# Altium PCB SPARC_v3.PcbDoc
Units mil, origin at the board's own origin, x right, y up, seen from the top; angles counter-clockwise.
Board outline 6000 x 4000 mil, 2 copper layers (Top Layer, Bottom Layer); 19 components, 16 nets, 91 pads, 0 vias.
Unrouted connection lines stored in the file: 55.
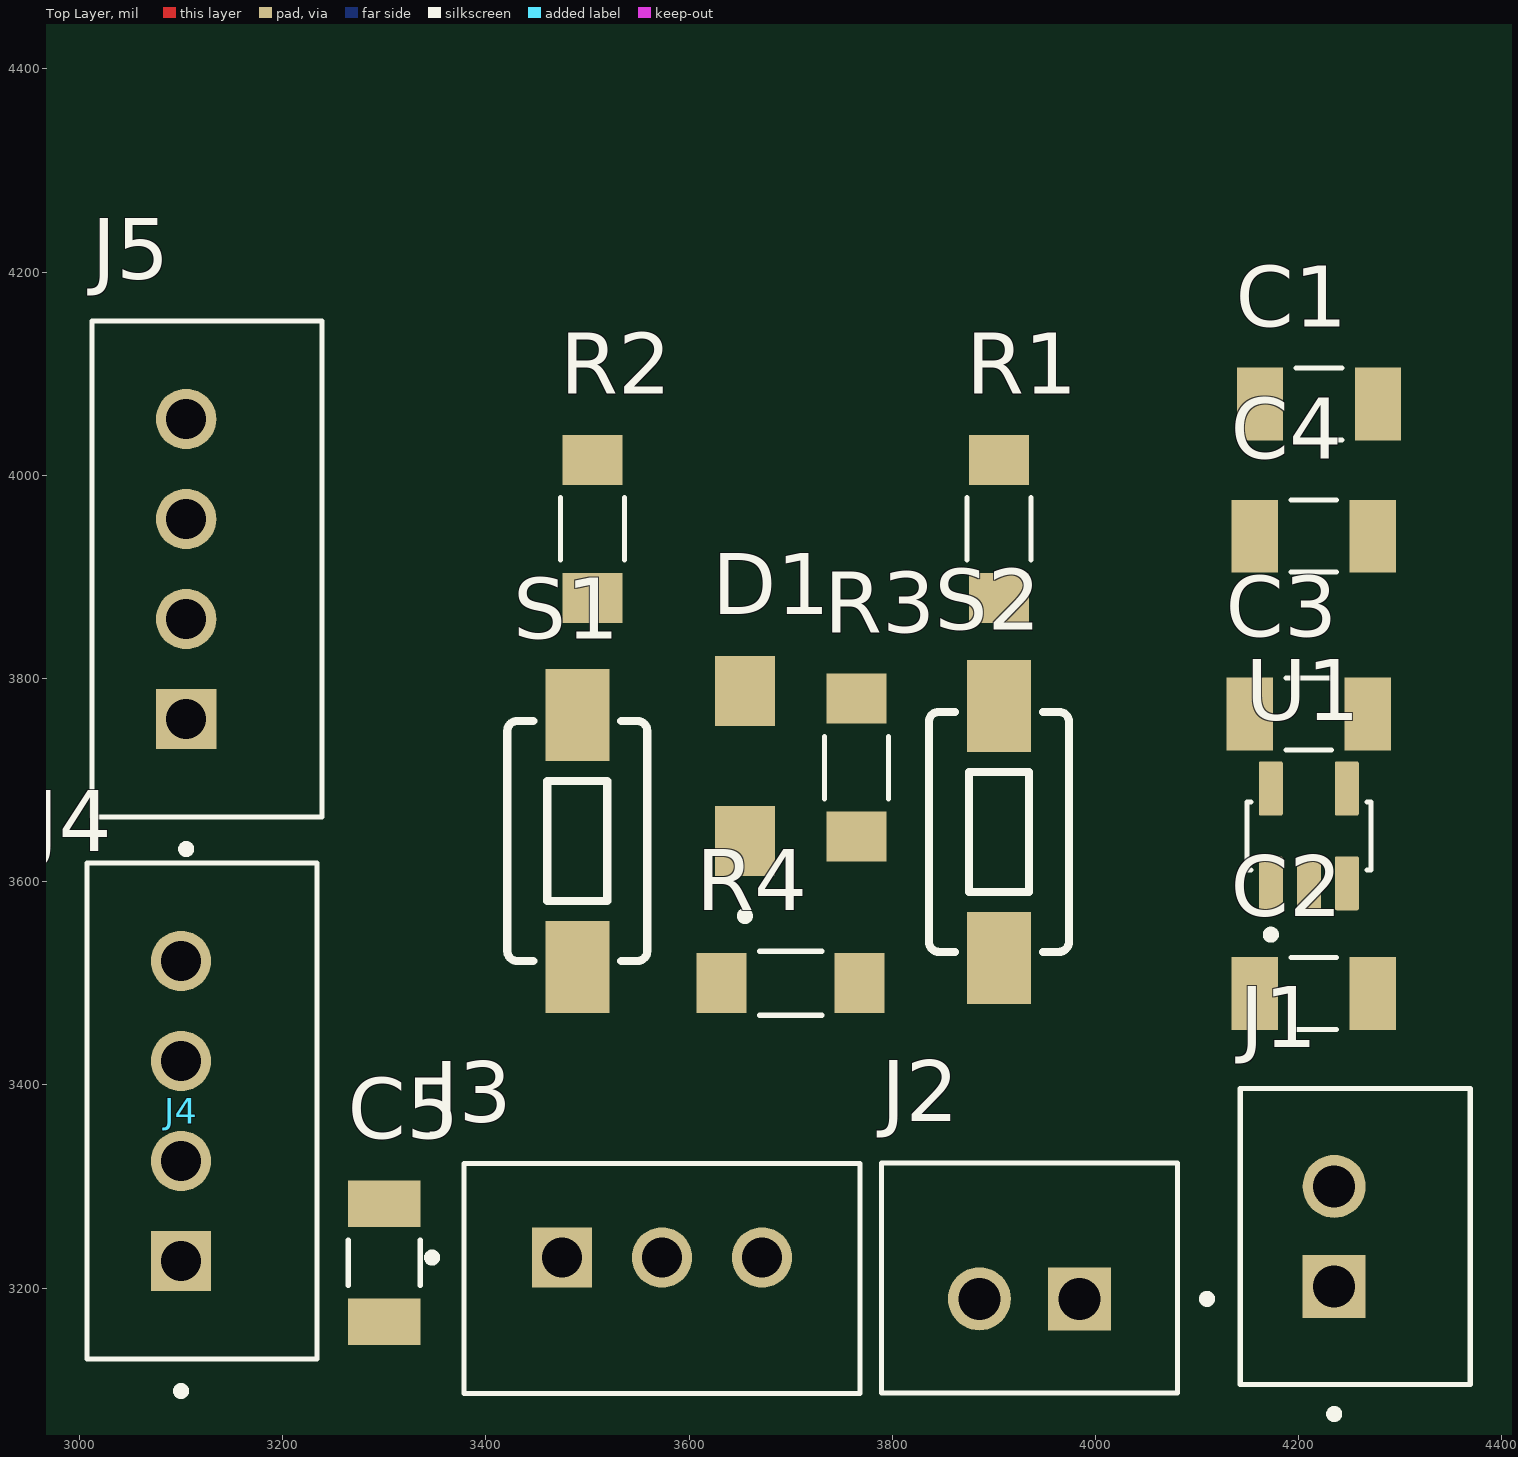
[diagram p0: Top Layer view]
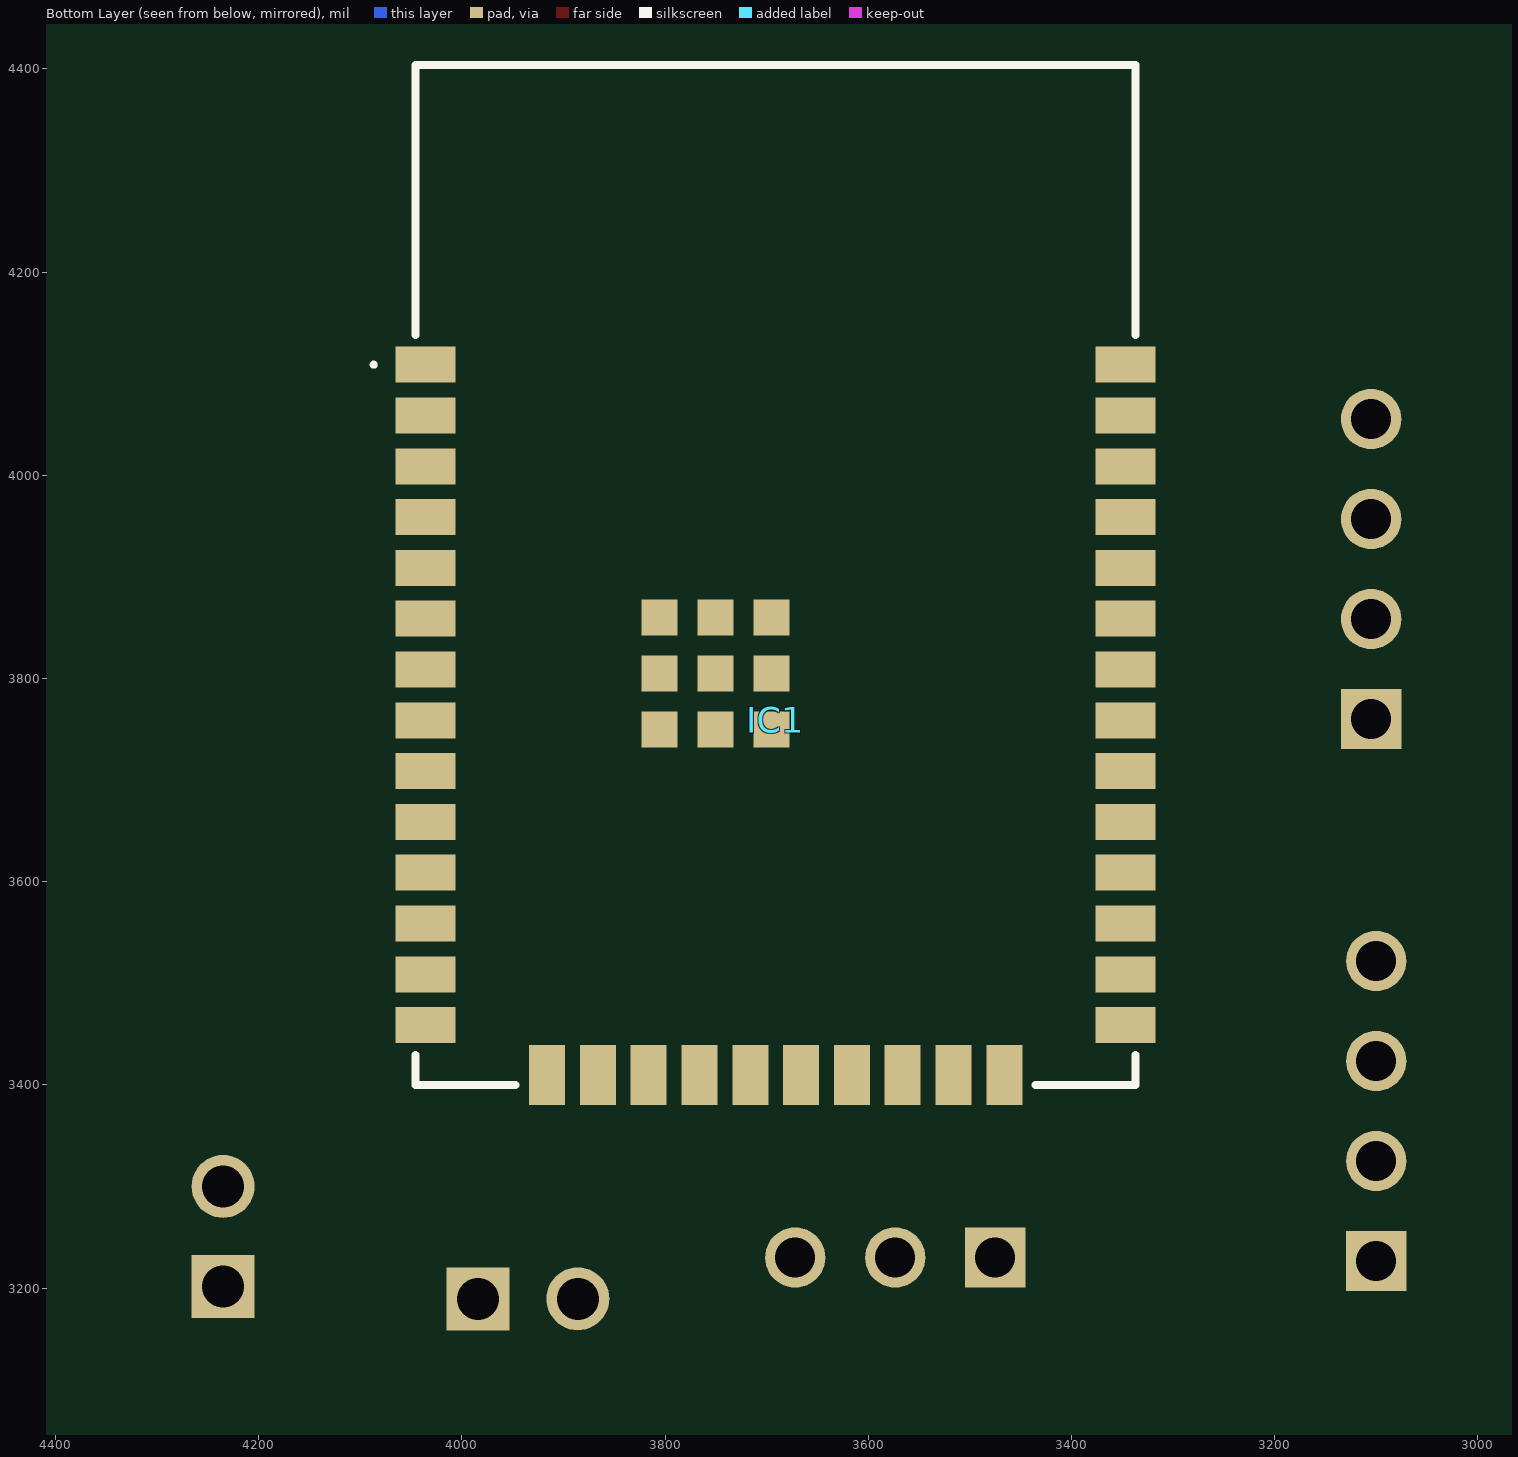
[diagram p1: Bottom Layer view, seen from below]

## Layer stack, top to bottom
Top Solder: solder mask 0.4, Solder Resist, Dk 3.5
Top Layer: signal copper 1.4
Dielectric 1: dielectric 12.6, FR-4, Dk 4.8
Bottom Layer: signal copper 1.4
Bottom Solder: solder mask 0.4, Solder Resist, Dk 3.5

## Board outline
1000,1000 7000,1000 7000,5000 1000,5000

## Design rules (kind name [scope] priority, off if disabled: settings)
Clearance [All] p1: gap=10 ignorepadtopadclearanceinfootprint=FALSE
PolygonConnect [All] p1: connectstyle=Relief reliefconductorwidth=10 reliefentries=4 polygonreliefangle="90 Angle" airgapwidth=10
RoutingVias [All] p1: holewidth=28 width=50 viastyle="Through Hole" minholewidth=28 minwidth=50 maxholewidth=28 maxwidth=50
SolderMaskExpansion [All] p1: expansion=0 istentingtop=FALSE
SupplyNets "Schematic Supply Nets_1" [InNet('+3V3')] p1: voltage=0.000
SupplyNets "Schematic Supply Nets" [InNet('GND')] p2: voltage=0.000
Width [All] p1: maxlimit=10 minlimit=10 preferedwidth=10
30 further rules are at their usual default settings.

## Components (designator, comment, footprint, x,y, rotation, side; value= is the part's Value field where it differs from the comment)
C1 "0.1uF" CAPC3216X110N 4220,4070 r180 top
C2 "10uF" CAPC3216X110N 4215,3490 r180 top
C3 "10uF" CAPC3216X110N 4210,3765 r180 top
C4 "10uF" CAPC3216X110N 4215,3940 r180 top
C5 "0.1uF" CAPC3216X110N 3300,3225 r90 top
D1 "APT3216SURCK" LED_APT3216SURCK 3655,3713.82 r90 top
IC1 "ESP32-WROOM-32E-N8" ESP32WROOM32EN8 3691.06,3901.73 r180 bottom
J1 "TP4056" JST_B2B-XH-A 4255.67,3250.79 r270 top
J2 "Switch" JST_B2B-XH-A 3935,3210 r0 top
J3 "NEOPIXEL" JST_B3B-XH-A 3573.43,3209.33 r180 top
J4 "VL53L0X" JST_B4B-XH-A 3120.67,3374.21 r270 top
J5 "CP2102" JST_B4B-XH-A 3125.67,3907.64 r270 top
R1 "10K" RES_ERJP08D8251V 3905,3947.09 r90 top
R2 "10K" RES_ERJP08D8251V 3505,3947.09 r90 top
R3 "10K" RES_ERJP08D8251V 3765,3712.09 r270 top
R4 "330" RES_ERJP08D8251V 3700,3500 r0 top
S1 "Button" TACTILE_SWITCH_SMD_6.0X3.5MM 3490,3640 r90 top
S2 "Button" TACTILE_SWITCH_SMD_6.0X3.5MM 3905,3649.02 r90 top
U1 "AP2112K-3.3TRG1" SOT95P285X140-5N 4210,3645 r90 top

## Footprints (in the part's own frame and the unit in brackets; to place one, negate y for a bottom-side part, rotate by r counter-clockwise, add the part's x,y. Pads: shape width x height; smd on the part's side, far side on the other; paste and mask are expansions set on the pad)
CAPC3216X110N [mm]
  rect 1.16x1.82 smd paste+0 mask+0.102: 1(-1.475,0) 2(1.475,0)
  silkscreen extent -0.57,-0.9 0.57,0.9, body extent -1.6,-0.8 1.6,0.8, height 0.85
ESP32WROOM32EN8 [mm]
  rect 1.5x0.9 smd: 1(-8.75,5.26) 2(-8.75,3.99) 3(-8.75,2.72) 4(-8.75,1.45) 5(-8.75,0.18) 6(-8.75,-1.09) 7(-8.75,-2.36) 8(-8.75,-3.63) 9(-8.75,-4.9) 10(-8.75,-6.17) 11(-8.75,-7.44) 12(-8.75,-8.71) 13(-8.75,-9.98) 14(-8.75,-11.25) 25(8.75,-11.25) 26(8.75,-9.98) 27(8.75,-8.71) 28(8.75,-7.44) 29(8.75,-6.17) 30(8.75,-4.9) 31(8.75,-3.63) 32(8.75,-2.36) 33(8.75,-1.09) 34(8.75,0.18) 35(8.75,1.45) 36(8.75,2.72) 37(8.75,3.99) 38(8.75,5.26)
  rect 0.9x1.5 smd: 15(-5.715,-12.5) 16(-4.445,-12.5) 17(-3.175,-12.5) 18(-1.905,-12.5) 19(-0.635,-12.5) 20(0.635,-12.5) 21(1.905,-12.5) 22(3.175,-12.5) 23(4.445,-12.5) 24(5.715,-12.5)
  rect 0.9x0.9 smd: 39(-2.9,-1.06) 40(-2.9,-2.46) 41(-2.9,-3.86) 42(-1.5,-3.86) 43(-0.1,-3.86) 44(-0.1,-2.46) 45(-0.1,-1.06) 46(-1.5,-1.06) 47(-1.5,-2.46)
  silkscreen extent -10.1,-12.75 9,12.75, body extent -9,-12.75 9,12.75, height 3.25
JST_B2B-XH-A [mm]
  rect 1.575x1.575 / inner round 1.575 / far side rect 1.575x1.575 hole 1.05: 1(1.25,-0.525)
  round 1.575 hole 1.05: 2(-1.25,-0.525)
  silkscreen extent -3.7,-2.88 4.54,2.88
JST_B3B-XH-A [mm]
  rect 1.508x1.508 / inner round 1.508 / far side rect 1.508x1.508 hole 1 mask+0.102: 1(2.5,-0.525)
  round 1.508 hole 1 mask+0.102: 2(0,-0.525) 3(-2.5,-0.525)
  silkscreen extent -4.95,-2.88 5.85,2.88, body extent -4.95,-2.88 4.95,2.88, height 7
JST_B4B-XH-A [mm]
  rect 1.508x1.508 / inner round 1.508 / far side rect 1.508x1.508 hole 1: 1(3.75,-0.525)
  round 1.508 hole 1: 2(1.25,-0.525) 3(-1.25,-0.525) 4(-3.75,-0.525)
  silkscreen extent -6.2,-2.88 7.1,2.88, body extent -6.2,-2.88 6.2,2.88, height 7
LED_APT3216SURCK [mm]
  rect 1.75x1.5 smd: 1(-1.875,0) 2(1.875,0)
  silkscreen extent -3.85,-0.1 -3.65,0.1
RES_ERJP08D8251V [mm]
  rect 1.25x1.5 smd: 1(-1.725,0) 2(1.725,0)
  silkscreen extent -0.78,-0.8 0.78,0.8
SOT95P285X140-5N [mm]
  rrect15% 1.35x0.6 smd: 1(-1.185,0.95) 2(-1.185,0) 3(-1.185,-0.95) 4(1.185,-0.95) 5(1.185,0.95)
  silkscreen extent -2.57,-1.55 0.85,1.55, body extent -1.5,-1.4 1.5,1.4, height 1.4
TACTILE_SWITCH_SMD_6.0X3.5MM [mm]
  rect 2.3x1.6 smd: 1(-3.15,0) 2(3.15,0)
  silkscreen extent -3,-1.75 3,1.75

## Part data
C1 C2 C3 C4 C5: "1206 C 1uF Ceramic Multilayer Capacitor, 50 VDC, +125degC, X7R Dielec, +/-10%", Package="1206 KEMET", Check_prices=https://www.snapeda.com/parts/C1206F105K5RACTU/Kemet/view-part/?ref=eda, MF=KEMET, MP=C1206F105K5RACTU, SnapEDA_Link=https://www.snapeda.com/parts/C1206F105K5RACTU/Kemet/view-part/?ref=snap
D1: "Red 630nm LED Indication - Discrete 1.95V 1206 (3216 Metric)", Package="1206 Kingbright", Check_prices=https://www.snapeda.com/parts/APT3216SURCK/Kingbright/view-part/?ref=eda, MF=Kingbright, MP=APT3216SURCK, SnapEDA_Link=https://www.snapeda.com/parts/APT3216SURCK/Kingbright/view-part/?ref=snap
IC1: "Bluetooth, WiFi 802.11b/g/n, Bluetooth v4.2 +EDR, Class 1, 2 and 3 Transceiver Module 2.4GHz ~ 2.5GHz PCB Trace Surface Mount", Package="SMD-44 Espressif Systems", Check_prices=https://www.snapeda.com/parts/ESP32-WROOM-32E-N8/Espressif+Systems/view-part/?ref=eda, MF="Espressif Systems", MP=ESP32-WROOM-32E-N8, SnapEDA_Link=https://www.snapeda.com/parts/ESP32-WROOM-32E-N8/Espressif+Systems/view-part/?ref=snap
J1 J2: Package=None, Availability=Unavailable, MF="{'manufacturer': u'JST Sales America Inc.'}", MP=B2B-XH-A, Price=None
J3: library part B3B-XH-A, "Connector Header Through Hole 3 position 0.098 (2.50mm)", Package=None, Check_prices=https://www.snapeda.com/parts/B3B-XH-A/JST/view-part/?ref=eda, MF="JST Sales", MP=B3B-XH-A, SnapEDA_Link=https://www.snapeda.com/parts/B3B-XH-A/JST/view-part/?ref=snap
J4 J5: "Connector Header Through Hole 4 position 0.098 (2.50mm)", Package=None, Check_prices=https://www.snapeda.com/parts/B4B-XH-A/JST/view-part/?ref=eda, MF="JST Sales", MP=B4B-XH-A, SnapEDA_Link=https://www.snapeda.com/parts/B4B-XH-A/JST/view-part/?ref=snap
R1 R2 R3: library part "10K R", Package=None, Availability=Unavailable, MP=ERJP08D8251V, Price=None
R4: library part "330 R", Package=None, Availability=Unavailable, MP=ERJP08D8251V, Price=None
S1 S2: library part PTS636SM25FSMTRLFS, "Switch Tactile N.O. SPST Rectangular Button F-Lead 0.05A 12VDC 1.77N SMD T/R", Package=None, Check_prices=https://www.snapeda.com/parts/PTS636SM25FSMTRLFS/C%2526K/view-part/?ref=eda, MF=CK, MP=PTS636SM25FSMTRLFS, SnapEDA_Link=https://www.snapeda.com/parts/PTS636SM25FSMTRLFS/C%2526K/view-part/?ref=snap
U1: "Linear Voltage Regulator IC Positive Fixed 1 Output 600mA SOT-25", Package="SOT-753 Diodes Inc.", Availability="In Stock", Check_prices=https://www.snapeda.com/parts/AP2112K-3.3TRG1/Diodes+Inc./view-part/?ref=eda, MF="Diodes Inc.", MP=AP2112K-3.3TRG1, Price=None, Purchase-URL=https://pricing.snapeda.com/search/part/AP2112K-3.3TRG1/?ref=eda, SnapEDA_Link=https://www.snapeda.com/parts/AP2112K-3.3TRG1/Diodes+Inc./view-part/?ref=snap

## Nets (pads, with @x,y where several pads share a name; then routed paths per layer and width w, separated by ;. In a path a pad name is that pad's centre, name@x,y a point inside that pad or via, vN(x,y) a via of type N, cw(c..) or ccw(c..) an arc to the next point about the centre after c; other vN are vias at no path point)
+3V3: C1.2 C3.2 C4.2 C5.2 IC1.2 J4.1 J5.1 R1.2 R2.2 U1.5
GND: C1.1 C2.1 C3.1 C4.1 C5.1 D1.1 IC1.1 IC1.15 IC1.38 J1.2 J3.1 J4.2 J5.2 S1.1 S2.1 U1.2
NetD1_2: D1.2 R3.1
NetIC1_1: IC1.39 IC1.40 IC1.41 IC1.42 IC1.43 IC1.44 IC1.45 IC1.46 IC1.47
NetIC1_3: IC1.3 R1.1 S2.2
NetIC1_12: IC1.12 R3.2
NetIC1_17: IC1.17 IC1.18 IC1.19 IC1.20 IC1.21 IC1.22 IC1.32
NetIC1_23: IC1.23 R4.1
NetIC1_25: IC1.25 R2.1 S1.2
NetIC1_27: IC1.27 J4.3
NetIC1_28: IC1.28 J4.4
NetIC1_34: IC1.34 J5.3
NetIC1_35: IC1.35 J5.4
NetJ1_1: J1.1 J2.2
NetJ3_3: J3.3 R4.2
TP4056+: C2.2 J2.1 J3.2 U1.1 U1.3
pads on no net: IC1.4 IC1.5 IC1.6 IC1.7 IC1.8 IC1.9 IC1.10 IC1.11 IC1.13 IC1.14 IC1.16 IC1.24 IC1.26 IC1.29 IC1.30 IC1.31 IC1.33 IC1.36 IC1.37 U1.4